# Altium PCB ePBR22_ACC_Charging.PcbDoc (part 2 of 3)
Units mil, origin at the board's own origin, x right, y up, seen from the top; angles counter-clockwise.
Board outline 10580 x 3865 mil, 2 copper layers (Top Layer, Bottom Layer); 147 components, 103 nets, 520 pads, 142 vias.
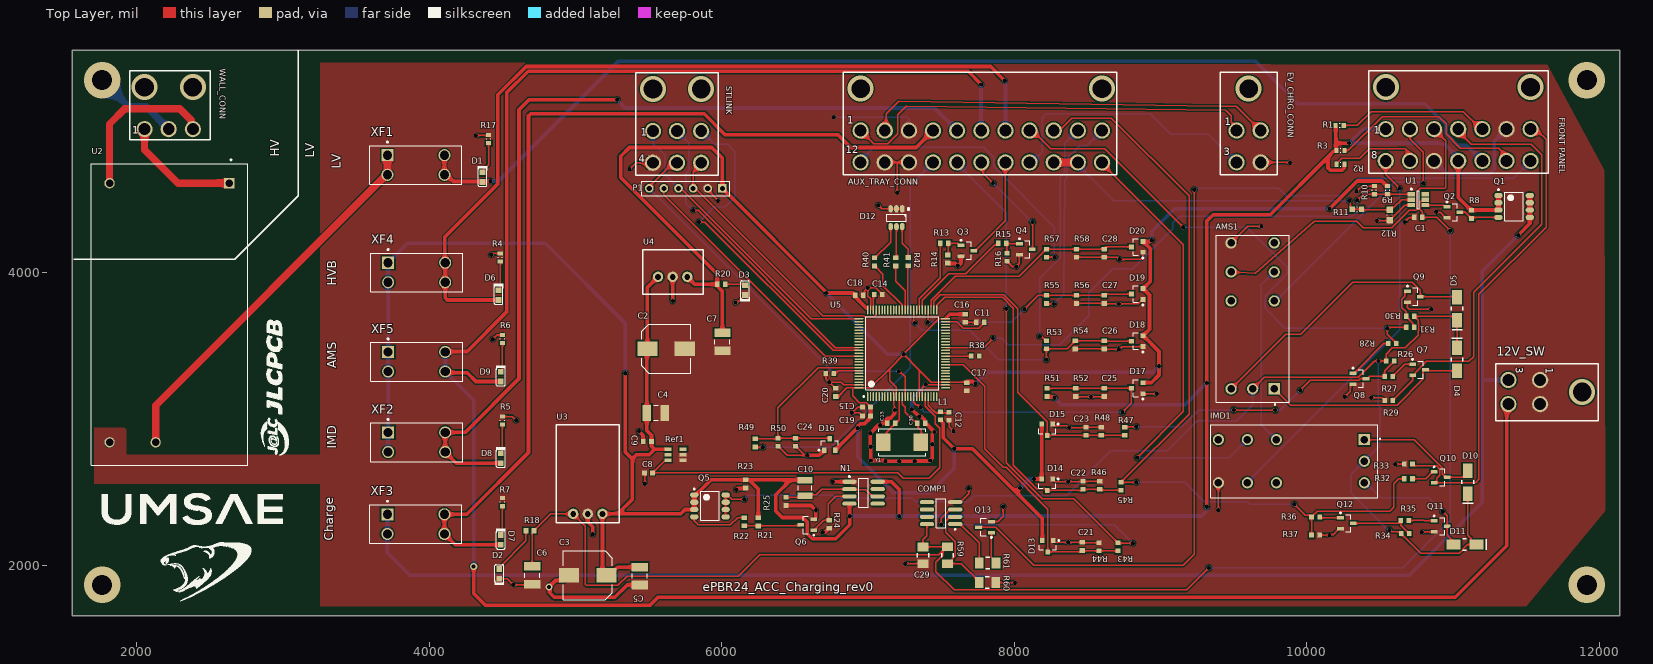
[diagram p0: Top Layer view]

## Part data (continued)
R22 R27 R28 R32 R35 R36: "RES SMD 100 OHM 5% 1/4W 0603", Manufacturer="Rohm Semiconductor", Manufacturer Part Number=ESR03EZPJ101, Operating Temperature="-55°C ~ 155°C", Package / Case="0603 (1608 Metric)", Power (Watts)="0.25W, 1/4W", Resistance (Ohms)=100, Supplier Device Package=0603, Supplier Part Number 1=RHM100DCT-ND, Temperature Coefficient=±200ppm/°C, Tolerance=±5%, Category=Resistors, ComponentLink1Description=http://rohmfs.rohm.com/en/products/databook/datasheet/passive/resistor/chip_resistor/esr.pdf, ComponentLink1URL=http://rohmfs.rohm.com/en/products/databook/datasheet/passive/resistor/chip_resistor/esr.pdf, Composition="Thick Film", Failure Rate=-, Features="Automotive AEC-Q200, Pulse Withstanding", Height - Seated (Max)="0.022\" (0.55mm)", LatestRevisionDate=17-Jul-2002, LatestRevisionNote="Re-released for DXP Platform.", PackageDescription="Axial Device, Thru-Hole; 2 Leads; 0.3 in Pin Spacing", PackageReference=AXIAL-0.3, Packaging="Cut Tape (CT)", Part Status=Active, Pricing 1="1=0.15, 10=0.119, 25=0.0824, 50=0.0642, 100=0.0458, 250=0.03568, 500=0.02836, 1000=0.02012 (CAD)", Published=8-Jun-2000, Publisher="Altium Limited", RoHS="RoHS Compliant", Size / Dimension="0.063\" L x 0.031\" W (1.60mm x 0.80mm)", Stock 1=57430, Supplier 1=Digi-Key
R25: "RES SMD 33K OHM 5% 1/4W 0603", Manufacturer="Rohm Semiconductor", Manufacturer Part Number=ESR03EZPJ333, Operating Temperature="-55°C ~ 155°C", Package / Case="0603 (1608 Metric)", Power (Watts)="0.25W, 1/4W", Resistance (Ohms)=33k, Supplier Device Package=0603, Supplier Part Number 1=RHM33KDCT-ND, Temperature Coefficient=±200ppm/°C, Tolerance=±5%, Category=Resistors, ComponentLink1Description=http://rohmfs.rohm.com/en/products/databook/datasheet/passive/resistor/chip_resistor/esr.pdf, ComponentLink1URL=http://rohmfs.rohm.com/en/products/databook/datasheet/passive/resistor/chip_resistor/esr.pdf, Composition="Thick Film", Failure Rate=-, Features="Automotive AEC-Q200, Pulse Withstanding", Height - Seated (Max)="0.022\" (0.55mm)", LatestRevisionDate=17-Jul-2002, LatestRevisionNote="Re-released for DXP Platform.", PackageDescription="Axial Device, Thru-Hole; 2 Leads; 0.3 in Pin Spacing", PackageReference=AXIAL-0.3, Packaging="Cut Tape (CT)", Part Status=Active, Pricing 1="1=0.15, 10=0.119, 25=0.0824, 50=0.0642, 100=0.0458, 250=0.03568, 500=0.02836, 1000=0.02012 (CAD)", Published=8-Jun-2000, Publisher="Altium Limited", RoHS="RoHS Compliant", Size / Dimension="0.063\" L x 0.031\" W (1.60mm x 0.80mm)", Stock 1=5269, Supplier 1=Digi-Key
R26 R30 R34: library part Res1, "RES SMD 1.0K OHM 5% 1/4W 0603", Manufacturer="Rohm Semiconductor", Manufacturer Part Number=ESR03EZPJ102, Operating Temperature="-55°C ~ 155°C", Package / Case="0603 (1608 Metric)", Power (Watts)="0.25W, 1/4W", Resistance (Ohms)=10k, Supplier Device Package=0603, Temperature Coefficient=±200ppm/°C, Tolerance=±5%, Category=Resistors, ComponentLink1Description=http://rohmfs.rohm.com/en/products/databook/datasheet/passive/resistor/chip_resistor/esr.pdf, ComponentLink1URL=http://rohmfs.rohm.com/en/products/databook/datasheet/passive/resistor/chip_resistor/esr.pdf, Composition="Thick Film", Failure Rate=-, Features="Automotive AEC-Q200, Pulse Withstanding", Height - Seated (Max)="0.022\" (0.55mm)", Packaging="Cut Tape (CT)", Part Status=Active, Pricing 1="1=0.15, 10=0.119, 25=0.0824, 50=0.0642, 100=0.0458, 250=0.03568, 500=0.02836, 1000=0.02012 (CAD)", RoHS="RoHS Compliant", Size / Dimension="0.063\" L x 0.031\" W (1.60mm x 0.80mm)", Stock 1=220, Supplier 1=Digi-Key, Supplier Part Number 1=RHM1.0KDCT-ND
R29 R33: "RES SMD 10K OHM 5% 1/4W 0603", Manufacturer="Rohm Semiconductor", Manufacturer Part Number=ESR03EZPJ103, Operating Temperature="-55°C ~ 155°C", Package / Case="0603 (1608 Metric)", Power (Watts)="0.25W, 1/4W", Resistance (Ohms)=10k, Supplier Part Number 1=RHM10KDCT-ND, Temperature Coefficient=±200ppm/°C, Tolerance=±5%, Category=Resistors, ComponentLink1Description=http://rohmfs.rohm.com/en/products/databook/datasheet/passive/resistor/chip_resistor/esr.pdf, ComponentLink1URL=http://rohmfs.rohm.com/en/products/databook/datasheet/passive/resistor/chip_resistor/esr.pdf, Composition="Thick Film", Failure Rate=-, Features="Automotive AEC-Q200, Pulse Withstanding", Height="0.022\" (0.55mm)", Height - Seated (Max)="0.022\" (0.55mm)", LatestRevisionDate=17-Jul-2002, LatestRevisionNote="Re-released for DXP Platform.", Number of Terminations=2, PackageDescription="Axial Device, Thru-Hole; 2 Leads; 0.3 in Pin Spacing", PackageReference=AXIAL-0.3, Packaging="Cut Tape (CT)", Part Status=Active, Pricing 1="1=0.15, 10=0.119, 25=0.0824, 50=0.0642, 100=0.0458, 250=0.03568, 500=0.02836, 1000=0.02012 (CAD)", Published=8-Jun-2000, Publisher="Altium Limited", RoHS="RoHS Compliant", Size / Dimension="0.063\" L x 0.031\" W (1.60mm x 0.80mm)", Stock 1=0, Supplier 1=Digi-Key, Supplier Device Package="0603 (1608 Metric)"
  R29: Supplier 2=Digi-Key, Supplier Part Number 2=311-10KGRCT-ND
R37: "RES SMD 2.2K OHM 5% 1/4W 0603", Manufacturer="Rohm Semiconductor", Manufacturer Part Number=ESR03EZPJ222, Operating Temperature="-55°C ~ 155°C", Package / Case="0603 (1608 Metric)", Power (Watts)="0.25W, 1/4W", Resistance (Ohms)=2.2k, Supplier Part Number 1=RHM2.2KDCT-ND, Temperature Coefficient=±200ppm/°C, Tolerance=±5%, Category=Resistors, ComponentLink1Description=http://rohmfs.rohm.com/en/products/databook/datasheet/passive/resistor/chip_resistor/esr.pdf, ComponentLink1URL=http://rohmfs.rohm.com/en/products/databook/datasheet/passive/resistor/chip_resistor/esr.pdf, Composition="Thick Film", Features="Automotive AEC-Q200, Pulse Withstanding", Height="0.022\" (0.55mm)", LatestRevisionDate=17-Jul-2002, LatestRevisionNote="Re-released for DXP Platform.", Number of Terminations=2, PackageDescription="Axial Device, Thru-Hole; 2 Leads; 0.3 in Pin Spacing", PackageReference=AXIAL-0.3, Packaging="Cut Tape (CT)", Pricing 1="1=0.15, 10=0.121, 25=0.0832, 100=0.0463, 250=0.03604, 500=0.02866, 1000=0.02033 (CAD)", Published=8-Jun-2000, Publisher="Altium Limited", RoHS="RoHS Compliant", Size / Dimension="0.063\" L x 0.031\" W (1.60mm x 0.80mm)", Stock 1=17564, Supplier 1=Digi-Key, Supplier Device Package="0603 (1608 Metric)"
R38 R39: "Resistor", Manufacturer=Yageo, Manufacturer Part Number=RC0603JR-0710KL, Operating Temperature="-55°C ~ 155°C", Package / Case="0603 (1608 Metric)", Power (Watts)="0.1W, 1/10W", Resistance (Ohms)=10k, Supplier Device Package=0603, Supplier Part Number 1=311-10KGRCT-ND, Temperature Coefficient=±100ppm/°C, Tolerance=±5%, Category=Resistors, ComponentLink1Description=http://www.yageo.com/NewPortal/yageodocoutput?fileName=/pdf/R-Chip/PYu-RC_Group_51_RoHS_L_4.pdf, ComponentLink1URL=http://www.yageo.com/NewPortal/yageodocoutput?fileName=/pdf/R-Chip/PYu-RC_Group_51_RoHS_L_4.pdf, Composition="Thick Film", Failure Rate=-, Features="Moisture Resistant", Height - Seated (Max)="0.022\" (0.55mm)", Number of Terminations=2, Packaging="Cut Tape (CT)", Part Status=Active, Pricing 1="1=0.16, 10=0.016, 25=0.0112, 50=0.0084, 100=0.0062, 250=0.0048, 500=0.00382, 1000=0.00281 (CAD)", RoHS="RoHS Compliant", Size / Dimension="0.063\" L x 0.031\" W (1.60mm x 0.80mm)", Stock 1=2936292, Supplier 1=Digi-Key
R40: "Resistor", Manufacturer=Yageo, Manufacturer Part Number=RC0603JR-07130RL, Operating Temperature="-55°C ~ 155°C", Package / Case="0603 (1608 Metric)", Power (Watts)="0.1W, 1/10W", Resistance (Ohms)=130, Supplier Device Package=0603, Supplier Part Number 1=311-130GRCT-ND, Temperature Coefficient=±100ppm/°C, Tolerance=±5%, Category=Resistors, ComponentLink1Description=http://www.yageo.com/NewPortal/yageodocoutput?fileName=/pdf/R-Chip/PYu-RC_Group_51_RoHS_L_4.pdf, ComponentLink1URL=http://www.yageo.com/NewPortal/yageodocoutput?fileName=/pdf/R-Chip/PYu-RC_Group_51_RoHS_L_4.pdf, Composition="Thick Film", Failure Rate=-, Features="Moisture Resistant", Height - Seated (Max)="0.022\" (0.55mm)", Number of Terminations=2, Packaging="Cut Tape (CT)", Part Status=Active, Pricing 1="1=0.16, 10=0.016, 25=0.0112, 50=0.0084, 100=0.0062, 250=0.0048, 500=0.00382, 1000=0.00281 (CAD)", RoHS="RoHS Compliant", Size / Dimension="0.063\" L x 0.031\" W (1.60mm x 0.80mm)", Stock 1=74185, Supplier 1=Digi-Key
R41 R42: "Resistor", Manufacturer=Yageo, Manufacturer Part Number=RC0603JR-0736RL, Operating Temperature="-55°C ~ 155°C", Package / Case="0603 (1608 Metric)", Power (Watts)="0.1W, 1/10W", Resistance (Ohms)=36, Supplier Device Package=0603, Supplier Part Number 1=311-36GRCT-ND, Temperature Coefficient=±100ppm/°C, Tolerance=±5%, Category=Resistors, ComponentLink1Description=http://www.yageo.com/NewPortal/yageodocoutput?fileName=/pdf/R-Chip/PYu-RC_Group_51_RoHS_L_4.pdf, ComponentLink1URL=http://www.yageo.com/NewPortal/yageodocoutput?fileName=/pdf/R-Chip/PYu-RC_Group_51_RoHS_L_4.pdf, Composition="Thick Film", Failure Rate=-, Features="Moisture Resistant", Height - Seated (Max)="0.022\" (0.55mm)", Number of Terminations=2, Packaging="Cut Tape (CT)", Part Status=Active, Pricing 1="1=0.16, 10=0.016, 25=0.0112, 50=0.0084, 100=0.0062, 250=0.0048, 500=0.00382, 1000=0.00281 (CAD)", RoHS="RoHS Compliant", Size / Dimension="0.063\" L x 0.031\" W (1.60mm x 0.80mm)", Stock 1=43300, Supplier 1=Digi-Key
R43 R49: "Resistor", Manufacturer="Panasonic Electronic Components", Manufacturer Part Number=ERJ-PB6B1801V, Operating Temperature="-55°C ~ 155°C", Package / Case="0805 (2012 Metric)", Power (Watts)="0.25W, 1/4W", Resistance (Ohms)=1.8k, Supplier Device Package=0805, Supplier Part Number 1=P20621CT-ND, Temperature Coefficient=±50ppm/°C, Tolerance=0.1%, Category=Resistors, ComponentLink1Description=https://industrial.panasonic.com/cdbs/www-data/pdf/RDM0000/AOA0000C100.pdf, ComponentLink1URL=https://industrial.panasonic.com/cdbs/www-data/pdf/RDM0000/AOA0000C100.pdf, Composition="Thick Film", Failure Rate=-, Features="Automotive AEC-Q200, Pulse Withstanding", Height - Seated (Max)="0.028\" (0.70mm)", Packaging="Cut Tape (CT)", Part Status=Active, Pricing 1="1=0.54, 10=0.461, 25=0.3348, 50=0.243, 100=0.1801, 250=0.13812, 500=0.10886, 1000=0.07537 (CAD)", RoHS="RoHS Compliant", Size / Dimension="0.079\" L x 0.049\" W (2.00mm x 1.25mm)", Stock 1=4965, Supplier 1=Digi-Key
R44 R50: "Resistor", Manufacturer="Panasonic Electronic Components", Manufacturer Part Number=ERJ-PB6B3301V, Operating Temperature="-55°C ~ 155°C", Package / Case="0805 (2012 Metric)", Power (Watts)="0.25W, 1/4W", Resistance (Ohms)=3.3k, Supplier Device Package=0805, Supplier Part Number 1=P20651CT-ND, Temperature Coefficient=±50ppm/°C, Tolerance=0.1%, Category=Resistors, ComponentLink1Description=https://industrial.panasonic.com/cdbs/www-data/pdf/RDM0000/AOA0000C100.pdf, ComponentLink1URL=https://industrial.panasonic.com/cdbs/www-data/pdf/RDM0000/AOA0000C100.pdf, Composition="Thick Film", Failure Rate=-, Features="Automotive AEC-Q200, Pulse Withstanding", Height - Seated (Max)="0.028\" (0.70mm)", Packaging="Cut Tape (CT)", Part Status=Active, Pricing 1="1=0.54, 10=0.461, 25=0.3348, 50=0.243, 100=0.1801, 250=0.13812, 500=0.10886, 1000=0.07537 (CAD)", RoHS="RoHS Compliant", Size / Dimension="0.079\" L x 0.049\" W (2.00mm x 1.25mm)", Stock 1=4675, Supplier 1=Digi-Key
R45 R47 R51 R53 R55 R57: "Resistor", Manufacturer=Yageo, Manufacturer Part Number=RC0603JR-075K1L, Operating Temperature="-55°C ~ 155°C", Package / Case="0603 (1608 Metric)", Power (Watts)="0.1W, 1/10W", Resistance (Ohms)=5.1k, Supplier Device Package=0603, Supplier Part Number 1=311-5.1KGRCT-ND, Temperature Coefficient=±100ppm/°C, Tolerance=±5%, Category=Resistors, ComponentLink1Description=http://www.yageo.com/NewPortal/yageodocoutput?fileName=/pdf/R-Chip/PYu-RC_Group_51_RoHS_L_4.pdf, ComponentLink1URL=http://www.yageo.com/NewPortal/yageodocoutput?fileName=/pdf/R-Chip/PYu-RC_Group_51_RoHS_L_4.pdf, Composition="Thick Film", Failure Rate=-, Features="Moisture Resistant", Height - Seated (Max)="0.022\" (0.55mm)", Number of Terminations=2, Packaging="Cut Tape (CT)", Part Status=Active, Pricing 1="1=0.16, 10=0.016, 25=0.0112, 50=0.0084, 100=0.0062, 250=0.0048, 500=0.00382, 1000=0.00281 (CAD)", RoHS="RoHS Compliant", Size / Dimension="0.063\" L x 0.031\" W (1.60mm x 0.80mm)", Stock 1=782184, Supplier 1=Digi-Key
R46 R48 R52 R54 R56 R58: "Resistor", Manufacturer=Yageo, Manufacturer Part Number=RC0603JR-075K1L, Operating Temperature="-55°C ~ 155°C", Package / Case="0603 (1608 Metric)", Power (Watts)="0.1W, 1/10W", Resistance (Ohms)=5.1k, Supplier Device Package=0603, Supplier Part Number 1=541-2789-1-ND, Temperature Coefficient=±100ppm/°C, Tolerance=±5%, Category=Resistors, ComponentLink1Description=http://www.yageo.com/NewPortal/yageodocoutput?fileName=/pdf/R-Chip/PYu-RC_Group_51_RoHS_L_4.pdf, ComponentLink1URL=http://www.yageo.com/NewPortal/yageodocoutput?fileName=/pdf/R-Chip/PYu-RC_Group_51_RoHS_L_4.pdf, ComponentLink2Description=http://www.vishay.com/docs/20065/rcse3.pdf, ComponentLink2URL=http://www.vishay.com/docs/20065/rcse3.pdf, Composition="Thick Film", Failure Rate=-, Features="Moisture Resistant", Height - Seated (Max)="0.022\" (0.55mm)", Number of Terminations=2, Packaging="Cut Tape (CT)", Part Status=Active, Pricing 1="1=0.21, 10=0.192, 25=0.1332, 50=0.1038, 100=0.0741, 250=0.05776, 500=0.04586, 1000=0.03257 (CAD)", RoHS="RoHS Compliant", Size / Dimension="0.063\" L x 0.031\" W (1.60mm x 0.80mm)", Stock 1=14165, Supplier 1=Digi-Key
R59: library part Res1, Supplier Part Number 1=RMCF1206FT10K0CT-ND, LatestRevisionDate=17-Jul-2002, LatestRevisionNote="Re-released for DXP Platform.", PackageDescription="Axial Device, Thru-Hole; 2 Leads; 0.3 in Pin Spacing", PackageReference=AXIAL-0.3, Published=8-Jun-2000, Publisher="Altium Limited", Supplier 1=Digi-Key
R60: library part Res1, "KTR18EZPF1501: RES SMD 1.5K OHM 1% 1/4W 1206", Supplier Part Number 1=RNCP1206FTD10K7CT-ND, LatestRevisionDate=17-Jul-2002, LatestRevisionNote="Re-released for DXP Platform.", PackageDescription="Axial Device, Thru-Hole; 2 Leads; 0.3 in Pin Spacing", PackageReference=AXIAL-0.3, Published=8-Jun-2000, Publisher="Altium Limited", Supplier 1=Digi-Key
R61: library part Res1, "KTR18EZPJ101: RES SMD 100 OHM 5% 1/4W 1206", Supplier Part Number 1=RHM100PCT-ND, LatestRevisionDate=17-Jul-2002, LatestRevisionNote="Re-released for DXP Platform.", PackageDescription="Axial Device, Thru-Hole; 2 Leads; 0.3 in Pin Spacing", PackageReference=AXIAL-0.3, Published=8-Jun-2000, Publisher="Altium Limited", Supplier 1=Digi-Key
Ref1: "TSOT-23-56", Current - Cathode=-, Current - Output=10mA, Current - Supply=600µA, Digikey Part Number=LT6654AHS6-3.3#TRMPBFCT-ND, Manufacturer="Linear Technology", Operating Temperature="-40°C ~ 125°C (TA)", Package / Case="SOT-23-6 Thin, TSOT-23-6", Supplier Device Package=TSOT-23-6, Temperature Coefficient=10ppm/°C, Tolerance=±0.05%, Voltage - Input="3.8 V ~ 36 V", Voltage - Output (Min/Fixed)=3.3V, Category="Integrated Circuits (ICs)", ComponentLink1Description=http://www.linear.com/docs/29677, ComponentLink1URL=http://www.linear.com/docs/29677, Digikey Link=http://www.digikey.com/product-detail/en/linear-technology/LT6654AHS6-3.3-TRMPBF/LT6654AHS6-3.3-TRMPBFCT-ND/2485839, Manufacturer Part Number=LT6654AHS6-3.3, Mounting Type="Surface Mount", Noise - 0.1Hz to 10Hz=1.7ppmp-p, Noise - 10Hz to 10kHz=2ppmrms, Output Type=Fixed, Packaging="Cut Tape (CT)", Part Status=Active, Pricing 1="1=9.53, 25=8.508, 100=5.5596, 250=5.1048 (CAD)", Reference Type=Series, RoHS="RoHS Compliant", Stock 1=1315, Supplier 1=Digi-Key, Supplier Part Number 1=LT6654AHS6-3.3#TRMPBFCT-ND, Voltage - Output (Max)=-
STLINK: "Header, 6-Pin", Supplier Part Number 1=WM1353-ND, LatestRevisionDate=17-Jul-2002, LatestRevisionNote="Re-released for DXP Platform.", Publisher="Altium Limited", Supplier 1=Digi-Key
U1: library part NC7SZ08, "IC GATE NAND 1CH 2-INP SC-70-5", Current - Output High, Low="8mA, 8mA", Current - Quiescent (Max)=1µA, Manufacturer="Texas Instruments", Manufacturer Part Number=SN74AHC1G00QDCKRQ1, Operating Temperature="-40°C ~ 125°C", Package / Case="5-TSSOP, SC-70-5, SOT-353", Supplier Device Package=SC-70-5, Supplier Part Number 1=296-23670-1-ND, Voltage - Supply="2 V ~ 5.5 V", Category="Integrated Circuits (ICs)", ComponentLink1Description=http://www.ti.com/lit/ds/symlink/sn74ahc1g00-q1.pdf, ComponentLink1URL=http://www.ti.com/lit/ds/symlink/sn74ahc1g00-q1.pdf, Features="Schmitt Trigger", Logic Level - High="1.5 V ~ 3.85 V", Logic Level - Low="0.5 V ~ 1.65 V", Logic Type="NAND Gate", Max Propagation Delay @ V, Max CL="7.5ns @ 5V, 50pF", Mounting Type="Surface Mount", Number of Circuits=1, Number of Inputs=2, Packaging="Cut Tape (CT)", Pricing 1="1=0.69, 10=0.524, 100=0.3262, 500=0.22294, 1000=0.17137 (CAD)", RoHS="RoHS Compliant", Stock 1=7211, Supplier 1=Digi-Key
U2: library part CMP-2000-07460-1, "Single Output Encapsulated Type, 12 V, 1.8 A, 21.6 W, -40 to 85 degC, 4-Pin THD, RoHS", Current - Output 1=1.8A, Manufacturer="Mean Well", Max Operating Temperature=70degC, Max Output Power=21.6W, Min Operating Temperature=-30degC, Package Description="4-Pin Through Hole Device, Body 52.4 x 27.2 mm, Height 24 mm", Package Quantity=240, Package Reference=IRM-20-12-4, Supplier Part Number 1=1866-3038-ND, Voltage - Output 1=12V, Approvals=CB, Datasheet URL=http://datasheet.octopart.com/IRM-20-12-Mean-Well-datasheet-42021592.pdf, Datasheet Version=06/2015, Efficiency=84%, Height=24mm, Lead Free=LeadFree, Length=53mm, Manufacturer URL=http://www.meanwellusa.com/, Mount=ThroughHole, Mounting Technology=ThroughHole, Number of Outputs=1, Number of Pins=4, Output Current=1.8A, Output Power=21.6W, Packaging=Bulk, RoHSCompliant=true, Supplier 1=Digi-Key, Weight=2.081164oz, Width=28mm
U3: "Voltage Regulator", Supplier Part Number 1=811-2692-ND, LatestRevisionDate=29-May-2009, LatestRevisionNote="IPC-7351 Footprint Added.", PackageDescription="3-Pin Transistor Outline Package 2.54 mm Pitch, 15.1 mm Lead Span", PackageReference=D2PAK, Published=24-Mar-1999, Publisher="Altium Limited", Supplier 1=Digi-Key
U4: "Voltage Regulator", Supplier Part Number 1=811-2195-5-ND, LatestRevisionDate=29-May-2009, LatestRevisionNote="IPC-7351 Footprint Added.", PackageDescription="3-Pin Transistor Outline Package 2.54 mm Pitch, 15.1 mm Lead Span", PackageReference=D2PAK, Published=24-Mar-1999, Publisher="Altium Limited", Supplier 1=Digi-Key
U5: library part CMP-0243-00042-2, "ARM Cortex-M4 32-bit MCU+FPU, 225 DMIPS, 2048 kB Flash, 256 kB Internal RAM, 81 I/Os, 100-pin LQFP, -40 to 85 degC, Tray", I/Os (High Current)=82, Manufacturer=STMicroelectronics, Manufacturer Part Number=STM32F446VET6, Operating Frequency(F) (Processor speed) (MHz)=180, Operating Temperature="-40°C ~ 85°C (TA)", Package / Case=100-LQFP, PartNumber=STM32F439VIT6, Supplier Device Package="100-LQFP (14x14)", Supplier Part Number 1=497-15375-ND, Supply Voltage(Vcc) max (V)=3.6, Supply Voltage(Vcc) min (V)=1.8, Voltage - Supply (Vcc/Vdd)="1.7 V ~ 3.6 V", Category="Integrated Circuits (ICs)", ComponentLink1Description="Manufacturer URL", ComponentLink1URL=http://www.st.com/web/en/home.html, ComponentLink2Description=Datasheet, ComponentLink2URL=http://www.st.com/st-web-ui/static/active/en/resource/technical/document/data_brief/DM00055510.pdf, ComponentLink3Description="Package Specification", ComponentLink3URL=http://www.st.com/st-web-ui/static/active/en/resource/technical/document/data_brief/DM00071938.pdf, ComponentLink5Description="ACTUAL DATASHEET", ComponentLink5URL=https://www.st.com/content/ccc/resource/technical/document/datasheet/65/cb/75/50/53/d6/48/24/DM00141306.pdf/files/DM00141306.pdf/jcr:content/translations/en.DM00141306.pdf, Connectivity="CAN, EBI/EMI, I²C, IrDA, LIN, SAI, SD, SPDIF-Rx, SPI, UART/USART, USB, USB OTG", Core="ARM Cortex-M4", Core Processor="ARM® Cortex®-M4", Core Size=32-Bit, D/A Converter=2x12-bit, Data Converters="A/D 16x12b, D/A 2x12b", DatasheetVersion="Rev. 2", EEPROM Size=-, FLASH Size (Prog) (kB)=2048, Internal RAM Size (kB)=256, Mounting Technology="Surface Mount", Number of I/O=81, Oscillator Type=Internal, PackageDescription="100-Pin Low Profile Quad Flat Package, 14 x 14 mm Body, 0.5 mm Pitch", PackageReference=LQFP100, PackageVersion="Rev. 1, 06/2013", Packaging=Tray, Packing=Tray, Part Status=Active, PartId=1, Peripherals="Brown-out Detect/Reset, DMA, I²S, LVD, POR, PWM, WDT", Pricing 1="1=14.71, 10=13.292, 100=11.0054, 500=9.58332, 1000=8.34676 (CAD)", Program Memory Size="512KB (512K x 8)", Program Memory Type=FLASH, Ram Size="128K x 8", RoHS="RoHS Compliant", Speed=180MHz, Stock 1=560, Supplier 1=Digi-Key
WALL_CONN: "Header, 3-Pin", Supplier Part Number 1=WM18446-ND, LatestRevisionDate=17-Jul-2002, LatestRevisionNote="Re-released for DXP Platform.", Publisher="Altium Limited", Supplier 1=Digi-Key
XF1 XF2 XF3 XF4 XF5: library part CMP-2000-05464-1, "Fuse Holder, 20 A, 500 V, -50 to 145 degC, 4-Pin THD, RoHS", Manufacturer=Keystone, Package Description="4-Pin Through Hole Device, Body 16 x 6.73 mm, Pitch 9.9 mm", Package Reference=3568, Datasheet URL=https://datasheet.ciiva.com/16294/m60-2p40-16294706.pdf, Datasheet Version=04/2013, Manufacturer URL=http://www.keyelco.com/, Mounting Technology=ThroughHole
Y1: library part XTAL, "Crystal Oscillator", LatestRevisionDate=17-Jul-2002, LatestRevisionNote="Re-released for DXP Platform.", PackageDescription="Crystal, Thru-Hole; 2 Leads; Body 3.1 x 8.2 mm (Dia.xH)", PackageReference=R38, Published=8-Jun-2000, Publisher="Altium Limited"

## Via types
v1: diameter 30, hole 30, Top Layer to Bottom Layer, 126 vias
v2: diameter 178, hole 128, Top Layer to Bottom Layer, 10 vias
v3: diameter 250, hole 137, Top Layer to Bottom Layer, 4 vias
v4: diameter 50, hole 28, Top Layer to Bottom Layer, 2 vias

## Nets (pads, with @x,y where several pads share a name; then routed paths per layer and width w, separated by ;. In a path a pad name is that pad's centre, name@x,y a point inside that pad or via, vN(x,y) a via of type N, cw(c..) or ccw(c..) an arc to the next point about the centre after c; other vN are vias at no path point)
3V3: C7.2 C15.2 C16.2 C17.2 C18.2 C19.2 C20.2 D13.2 D14.2 D15.2 D16.2 D17.2 D18.2 D19.2 D20.2 L1.2 P1.1 R9.2 R20.1 U4.3 U5.11 U5.19 U5.28 U5.50 U5.75 U5.100 | length 14722.9
  Top Layer w10: C20.2@6791.97,3147.09 6856.42,3211.54 6892.54,3211.54 ; U5.100@6937.95,3211.54 6892.54,3211.54 ; U5.100@6940,3211.54 7016.54,3211.54 7148.19,3343.19 ; C15.2@7017.56,3080 7017.56,3081.97 7006.81,3092.72 7004.84,3092.72 6986.97,3110.59 6940.18,3110.59 6894.86,3155.91 6894.86,3209.21 6892.54,3211.54 ; U5.11@7194.84,3151.5 7194.84,3214.2 7148.19,3260.85 7148.19,3343.19 ; U5.19@7352.32,3151.5 7352.32,3332.68 ; U5.50@7530.47,3683.98 7484.96,3683.98 7245,3444.02 v1(7245,3440) ; C17.2@7675.91,3250.91 U5.28@7530.47,3250.91 7434.09,3250.91 7352.32,3332.68 ; 7148.19,3343.19 v1(7245,3440) ; v1(7245,3440) 7352.32,3332.68
  Top Layer w25: U4.3@5753.94,3981.05 5756.87,3978.12 U4.3@5765,3969.99 5815,3919.99 R20.1@5969.88,3919.99 5969.88,3990.12 5310,4650 5310,4795 5370,4855 5931.61,4855 6005,4781.61 P1.1@6005,4575 6715,3865 v1(6715,3860) 6897.09,3860 6907.22,3849.86 6909.19,3849.86 6912.44,3846.61 C18.2@6912.44,3844.65 6915.69,3841.4 6915.69,3830.17 6990.86,3755 ; 5973.13,3901.87 6005,3870 C7.2@6005,3587.04 ; D16.2@6777.4,2785.28 6780.65,2788.52 6780.65,2790.49 6924.21,2934.06 6929.04,2934.06 v1(6930,2935.01) ; C20.2@6778.03,3152.44 C20.2@6780,3152.44 ; C20.2@6790,3147.09 C20.2@6791.97,3147.09 ; v1@6929.04,2937.32 6930.96,2937.32 6930.96,2949.99 6947.14,2966.17 6976.17,2966.17 7014.31,3004.31 7014.31,3016.75 C19.2@7017.56,3020 C15.2@7017.56,3080 ; L1.2@7495,2990 7499.41,2990 7500.22,2989.19 7500.22,2984.78 7515,2970 7515,2870 v1(7590,2795) 7715,2795 8011.59,2498.41 ; 7535,3690 7559.76,3714.76 C16.2@7665,3714.76 ; C17.2@7675,3254.76 C17.2@7679.76,3254.76 ; C17.2@7675.91,3250.91 C17.2@7679.76,3254.76 ; C17.2@7680,3255 C17.2@7679.76,3254.76 ; v1(7735,3240) 7729.59,3240 7714.82,3254.76 C17.2@7679.76,3254.76 ; v1(8040,2526.81) 8011.59,2498.41 ; v1(8135,2588.19) 8135.41,2588.6 8187.19,2588.6 D14.2@8187.6,2589.02 D15.2@8187.6,2964.02 ; D13.2@8192.6,2169.02 8192.6,2317.4 8011.59,2498.41 ; D17.2@8879.37,3247.05 8937.05,3247.05 8990,3300 v1(8990,3360) 8990,3460.05 D18.2@8881.34,3568.71 ; D18.2@8879.37,3568.71 D18.2@8881.34,3568.71 ; D20.2@8879.37,4212.05 D20.2@8881.34,4212.05 ; v1(8940,4220) 8934.59,4220 8926.64,4212.05 D20.2@8881.34,4212.05 ; v1(10155,4435) 10345,4625 10513.27,4625 10548.31,4589.96 R9.2@10552.24,4589.96 ; D18.2@8881.34,3568.71 8925,3612.38 8925,3846.72 8881.34,3890.38 D19.2@8879.37,3890.38 8882.62,3893.63 8884.59,3893.63 8930,3939.04 8930,4163.39 D20.2@8881.34,4212.05
  Bottom Layer w25: v1(6715,3860) 7135,3440 v1(7245,3440) ; v1(6930,2935.01) 6930,2740 7175,2495 7425,2495 7590,2660 v1(7590,2795) ; v1(7735,3240) 7812.02,3317.02 8947.02,3317.02 v1(8990,3360) ; v1(8040,2526.81) 8101.38,2588.19 v1(8135,2588.19) ; v1(8940,4220) 8940,4280 9095,4435 v1(10155,4435)
3V3_ON: D3.1 R20.2 | length 137.7
  Top Layer w10: R20.2@6025,3919.99 6153.47,3919.99 D3.1@6160,3913.46
3V3Ref: C8.2 Ref1.6 U5.21 | length 2675.8
  Top Layer w10: Ref1.6@5633.43,2717.6 5626.22,2710.39 5605.98,2710.39 5527.56,2631.97 C8.2@5527.56,2630 7204.68,2630 7239.68,2595 7419.38,2595 7489.63,2665.25 7489.63,2935.37 7460,2965 7460,3017 7391.69,3085.31 U5.21@7391.69,3151.5